# Altium PCB NeoLink Basic Main Board.PcbDoc (part 4 of 5)
Units mm, origin at the board's own origin, x right, y up, seen from the top; angles counter-clockwise.
Board outline 70 x 115 mm, 6 copper layers (Top Layer, Layer 2, Layer 3, Layer 4, Layer 5, Bottom Layer), stack 1.148 mm thick; 467 components, 265 nets, 1397 pads, 1169 vias.
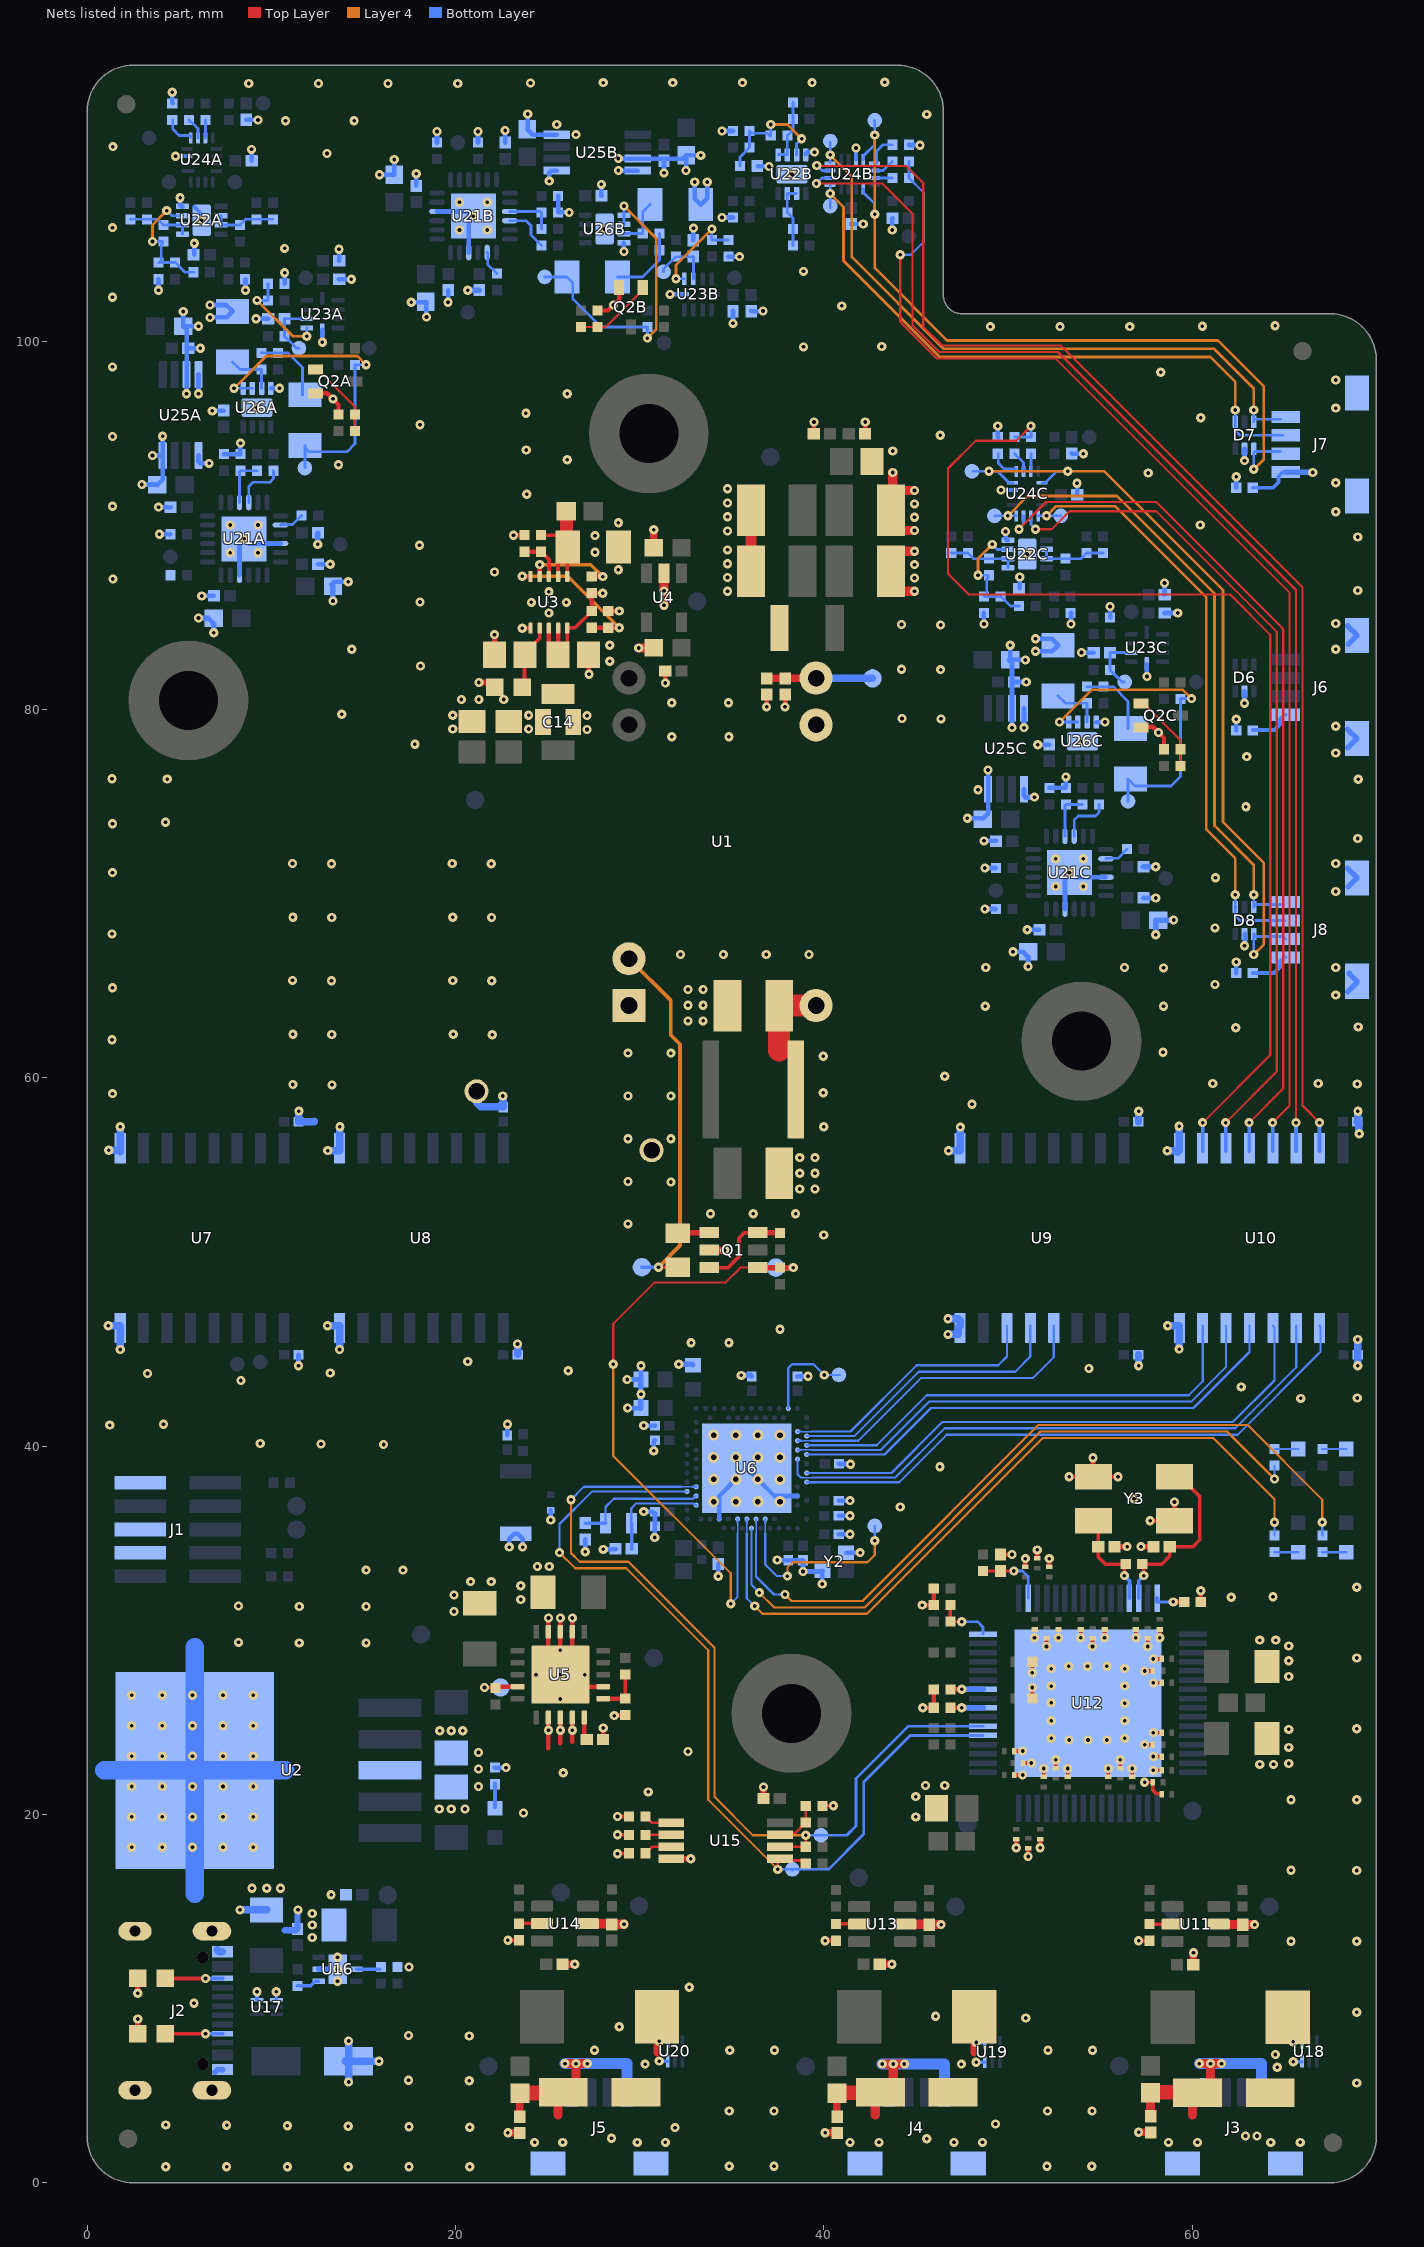
[diagram p7: the nets of this part, all layers, seen from the top]

## Via types
v1: diameter 0.5, hole 0.2, Top Layer to Bottom Layer, tented both sides, 1097 vias
v2: diameter 0.8, hole 0.4, Top Layer to Bottom Layer, tented both sides, 32 vias
v3: diameter 0.5, hole 0.2, Top Layer to Bottom Layer, 24 vias
v4: diameter 0.6, hole 0.3, Top Layer to Bottom Layer, 16 vias

## Nets (pads, with @x,y where several pads share a name; then routed paths per layer and width w, separated by ;. In a path a pad name is that pad's centre, name@x,y a point inside that pad or via, vN(x,y) a via of type N, cw(c..) or ccw(c..) an arc to the next point about the centre after c; other vN are vias at no path point) (continued)
ECG_CH1_LED_IND: R23.2 U6.B13 | length 40.6
  Layer 4 w0.12: v1(36.25,31.325) 36.675,30.9 42.35,30.9 51.9,40.45 61.15,40.45 64.475,37.125 v1(64.475,35.875)
  Bottom Layer w0.076: 35.825,35.25 35.825,35.85
  Bottom Layer w0.12: 35.825,35.25 35.825,31.75 v1(36.25,31.325) ; 35.825,35.85 U6.B13@35.825,36.05 ; R23.2@64.475,35.15 v1@64.475,35.825
ECG_CH1_NEGA: R81A.1 R82A.1 R85A.2 U22A.6 U22A.7 | length 3.4
  Bottom Layer w0.12: R81A.1@9.2,106.625 R82A.1@10.1,106.625
  Bottom Layer w0.15: U22A.6@7.275,106.825 U22A.7@7.275,106.325 R85A.2@8.3,106.325 8.6,106.625 R81A.1@9.2,106.625
ECG_CH1_NEGB: R81B.1 R82B.1 R85B.2 U22B.6 U22B.7 | length 3.4
  Bottom Layer w0.15: R82B.1@38.325,105.2 R81B.1@38.325,106.1 38.325,106.7 R85B.2@38.025,107 U22B.7@38.025,108.025 U22B.6@38.525,108.025
ECG_CH1_NEGC: R81C.1 R82C.1 R85C.2 U22C.6 U22C.7 | length 3.7
  Bottom Layer w0.15: U22C.6@52.1,88.7 U22C.7@52.1,88.2 53.975,88.2 R81C.1@54.275,88.5 R82C.1@55.175,88.5
ECG_CH1_POSA: R65A.2 R72A.1 R75A.1 U22A.1 U22A.2 | length 3.4
  Bottom Layer w0.15: R72A.1@2.35,106.625 R75A.1@3.25,106.625 3.85,106.625 R65A.2@4.15,106.325 U22A.2@5.175,106.325 U22A.1@5.175,105.825
ECG_CH1_POSB: R65B.2 R72B.1 R75B.1 U22B.1 U22B.2 | length 3.4
  Bottom Layer w0.15: U22B.1@37.525,110.15 38.025,110.15 R65B.2@38.025,111.175 38.325,111.475 R75B.1@38.325,112.075 R72B.1@38.325,112.975
ECG_CH1_POSC: R65C.2 R72C.1 R75C.1 U22C.1 U22C.2 | length 3.7
  Bottom Layer w0.15: R72C.1@46.925,88.5 R75C.1@47.825,88.5 48.125,88.2 U22C.2@50,88.2 U22C.1@50,87.7
ECG_CH1_SW_NEG: U6.W24 U9.5 | length 15.6
  Bottom Layer w0.12: U6.W24@39.075,40.55 41.664,40.55 45.164,44.05 50.4,44.05 51.22,44.87 U9.5@51.22,46.55
ECG_CH1_SW_POS: U6.V23 U9.4 | length 17.5
  Bottom Layer w0.076: 38.775,40.3 39.375,40.3
  Bottom Layer w0.12: U6.V23@38.575,40.3 38.775,40.3 ; 39.375,40.3 41.875,40.3 45.275,43.7 51.35,43.7 52.49,44.84 U9.4@52.49,46.55
ECG_CH1_SW_RLD: U6.Y23 U9.6 | length 14.7
  Bottom Layer w0.076: 38.775,40.8 39.375,40.8
  Bottom Layer w0.12: U6.Y23@38.575,40.8 38.775,40.8 ; 39.375,40.8 41.45,40.8 45.05,44.4 49.475,44.4 49.95,44.875 U9.6@49.95,46.55
ECG_CH2.SW_NEG_ISO: U10.14 U24B.14 | length 70.1
  Top Layer w0.12: v1(39.6,108.575) 43.175,108.575 44.825,106.925 44.825,100.875 46.275,99.425 52.725,99.425 65.65,86.5 v1(65.65,57.575)
  Bottom Layer w0.15: v1(39.6,108.575) 39.9,108.875 U24B.14@40.35,108.875
  Bottom Layer w0.2: U10.14@65.65,56.03 v1(65.65,57.575)
ECG_CH2.SW_POS_ISO: U10.15 U24B.15 | length 72.3
  Top Layer w0.12: v1(39.625,109.55) 39.65,109.525 44.475,109.525 45.4,108.6 45.4,100.8 46.425,99.775 52.875,99.775 66,86.65 66,58.5 v1(66.925,57.575)
  Bottom Layer w0.15: v1(39.625,109.55) 39.9,109.275 U24B.15@40.35,109.275
  Bottom Layer w0.2: U10.15@66.925,56.03 v1(66.925,57.575)
ECG_CH2.SW_RLD_ISO: R21B.2 R24B.2 U10.13 | length 67.8
  Top Layer w0.12: v1(44.15,104.7) 44.15,101.05 46.125,99.075 52.575,99.075 65.3,86.35 65.3,58.5 v1(64.375,57.575)
  Bottom Layer w0.12: v1(44.15,104.7) 44.725,104.7 45.4,105.375 45.4,108.1 R21B.2@44.625,108.875
  Bottom Layer w0.15: R21B.2@44.625,108.875 R24B.2@44.625,109.775
  Bottom Layer w0.2: U10.13@64.375,56.03 v1(64.375,57.575)
ECG_CH2_CON_NEG: D7.4 J7.2 TP34B.1 U24B.13 | length 34.5
  Layer 4 w0.15: v1(40.35,108.025) 41.075,107.3 41.075,104.375 46.3,99.15 61,99.15 62.35,97.8 v1(62.35,96.275)
  Bottom Layer w0.15: TP34B.1@40.35,107.275 v1(40.35,108.025) U24B.13@40.35,108.5 ; v1(62.35,96.275) D7.4@62.35,95.635 62.35,95.15 62.6,94.9 J7.2@64.926,94.9
ECG_CH2_CON_POS: D7.6 J7.1 TP31B.1 U24B.16 | length 35.2
  Layer 4 w0.15: v1(40.35,110.125) 41.525,108.95 41.525,104.575 46.5,99.6 61.2,99.6 63.35,97.45 v1(63.35,96.275)
  Bottom Layer w0.15: U24B.16@40.35,109.7 v1(40.35,110.125) TP31B.1@40.35,110.8 ; D7.6@63.35,95.635 v1(63.35,96.275) ; D7.6@63.355,95.775 J7.1@64.801,95.775
ECG_CH2_CON_RLD: D7.1 J7.3 TP37B.1 U24B.4 U24B.9 | length 42.1
  Layer 4 w0.15: v1(42.775,111.2) v1(42.775,106.9) 42.775,103.975 46.7,100.05 61.4,100.05 63.9,97.55 63.9,93.6 v1(63.35,93.05)
  Bottom Layer w0.15: U24B.9@42.15,108.275 42.175,108.25 42.175,108.05 42.775,107.45 v1(42.775,106.9) ; U24B.4@42.15,109.875 42.175,109.9 42.175,110.1 42.775,110.7 v1(42.775,111.2) 42.775,111.95 TP37B.1@42.737,111.987 ; v1(63.35,93.05) 63.35,93.945 63.43,94.025 J7.3@64.802,94.025
ECG_CH2_LED_IND: R16.2 U6.A14 | length 37.7
  Layer 4 w0.12: v1(36.506,32.053) 37.309,31.25 42.225,31.25 51.775,40.8 61.9,40.8 v1(64.475,38.225)
  Bottom Layer w0.12: U6.A14@36.075,35.55 36.075,32.484 v1(36.506,32.053) ; v1@64.475,38.275 R16.2@64.475,38.95
ECG_CH2_SW_NEG: U6.P23 U10.3 | length 32.7
  Bottom Layer w0.076: 38.875,38.3 39.375,38.3
  Bottom Layer w0.12: U6.P23@38.575,39.3 38.575,38.475 38.75,38.3 38.875,38.3 ; 39.375,38.3 43.889,38.3 46.564,40.975 62.35,40.975 65.66,44.285 U10.3@65.66,46.55
ECG_CH2_SW_POS: U6.J24 U10.2 | length 32.3
  Bottom Layer w0.12: U6.J24@39.075,38.05 44.1,38.05 46.675,40.625 62.475,40.625 66.975,45.125 66.975,46.505 U10.2@66.93,46.55
ECG_CH2_SW_RLD: U6.L24 U10.4 | length 30.5
  Bottom Layer w0.12: U6.L24@39.075,38.55 43.675,38.55 46.45,41.325 62.225,41.325 64.475,43.575 64.475,46.465 U10.4@64.39,46.55
ECG_CH3.SW_NEG_ISO: U10.11 U24C.14 | length 46.4
  Top Layer w0.12: v1(51.5,89.8) 52.375,89.8 53.35,90.775 58.05,90.775 64.6,84.225 64.6,60.35 v1(61.825,57.575)
  Bottom Layer w0.15: U24C.14@51.25,90.525 51.25,90.05 v1(51.5,89.8)
  Bottom Layer w0.2: U10.11@61.825,56.03 v1(61.825,57.575)
ECG_CH3.SW_POS_ISO: U10.12 U24C.15 | length 47.8
  Top Layer w0.12: v1(50.6,89.8) 52.075,91.275 58.05,91.275 64.95,84.375 64.95,59.425 v1(63.1,57.575)
  Bottom Layer w0.15: v1(50.6,89.8) 50.85,90.05 U24C.15@50.85,90.525
  Bottom Layer w0.2: U10.12@63.1,56.03 v1(63.1,57.575)
ECG_CH3.SW_RLD_ISO: R21C.2 R24C.2 U10.10 | length 61.1
  Top Layer w0.12: v1(51.25,95.4) 50.45,94.6 48.25,94.6 46.75,93.1 46.75,87.375 47.875,86.25 62.075,86.25 64.25,84.075 64.25,61.25 v1(60.575,57.575)
  Bottom Layer w0.15: R24C.2@50.375,94.8 51.275,94.8 51.25,94.825 v1(51.25,95.4)
  Bottom Layer w0.2: U10.10@60.575,56.03 v1(60.575,57.575)
ECG_CH3_CON_NEG: D8.4 J8.2 TP34C.1 U24C.13 | length 32.9
  Layer 4 w0.15: v1(52.1,90.525) 52.625,91.05 55.825,91.05 60.775,86.1 60.775,73.5 62.35,71.925 v1(62.35,69.95)
  Bottom Layer w0.15: U24C.13@51.65,90.525 v1(52.1,90.525) TP34C.1@52.875,90.525 ; v1(62.35,69.95) D8.4@62.35,69.285 62.35,68.8 62.6,68.55 J8.2@65.052,68.55
ECG_CH3_CON_POS: D8.6 J8.1 TP31C.1 U24C.16 | length 34.4
  Layer 4 w0.15: v1(50,90.525) 51.075,91.6 55.925,91.6 61.225,86.3 61.225,73.7 63.35,71.575 v1(63.35,69.95)
  Bottom Layer w0.15: TP31C.1@49.3,90.525 v1(50,90.525) U24C.16@50.45,90.525 ; D8.6@63.35,69.285 v1(63.35,69.95) ; D8.6@63.355,69.425 J8.1@64.801,69.425
ECG_CH3_CON_RLD: D8.1 J8.3 TP37C.1 U24C.4 U24C.9 | length 43.4
  Layer 4 w0.15: v1(48.975,92.95) v1(53.25,92.95) 55.225,92.95 61.675,86.5 61.675,73.9 63.9,71.675 63.9,67.25 v1(63.35,66.7)
  Bottom Layer w0.15: TP37C.1@48.1,92.95 v1(48.975,92.95) 49.425,92.95 50.05,92.325 U24C.4@50.275,92.325 ; U24C.9@51.875,92.325 52.05,92.325 52.675,92.95 v1(53.25,92.95) ; v1(63.35,66.7) D8.1@63.35,67.815 ; D8.1@63.375,67.815 63.375,67.755 D8.1@63.455,67.675 ; D8.1@63.43,67.675 J8.3@64.927,67.675 ; J8.3@64.952,67.675 J8.3@65.077,67.55
ECG_CH3_LED_IND: R22.2 U6.B15 | length 42
  Layer 4 w0.12: v1(37.9,31.95) 38.25,31.6 42.1,31.6 51.65,41.15 63.025,41.15 67.075,37.1 v1(67.075,35.875)
  Bottom Layer w0.076: 36.325,35.25 36.325,35.85
  Bottom Layer w0.12: 36.325,35.25 36.325,32.925 37.3,31.95 v1(37.9,31.95) ; 36.325,35.85 U6.B15@36.325,36.05 ; R22.2@67.075,35.15 v1@67.075,35.85
ECG_CH3_SW_NEG: U6.T23 U10.6 | length 27.4
  Bottom Layer w0.076: 38.775,39.8 39.375,39.8
  Bottom Layer w0.12: U6.T23@38.575,39.8 38.775,39.8 ; 39.375,39.8 43.089,39.8 45.714,42.425 59.95,42.425 61.85,44.325 61.85,45.092 U10.6@61.85,46.55
ECG_CH3_SW_POS: U6.R24 U10.5 | length 27.8
  Bottom Layer w0.12: U6.R24@39.075,39.55 43.3,39.55 45.825,42.075 60.075,42.075 63.12,45.12 U10.5@63.12,46.55
ECG_CH3_SW_RLD: U6.U24 U10.7 | length 26
  Bottom Layer w0.12: U6.U24@39.075,40.05 42.875,40.05 45.6,42.775 59.825,42.775 60.58,43.53 U10.7@60.58,46.55
ENABLE_5V_ISO: Q1.1 R8.2 TP6.1 U6.B11 | length 34.4
  Top Layer w0.12: v1(28.575,44.45) 28.575,46.65 30.825,48.9 34.675,48.9 35.475,49.7 Q1.1@36.425,49.7
  Top Layer w0.3: Q1.1@36.425,49.7 R8.2@37.625,49.7 v1(38.35,49.7)
  Layer 4 w0.12: v1(28.575,44.45) 28.575,39.475 34.95,33.1 v1(34.95,31.45)
  Bottom Layer w0.076: 35.325,35.25 35.325,35.85
  Bottom Layer w0.12: v1(34.95,31.45) 35.325,31.825 35.325,35.25 ; 35.325,35.85 U6.B11@35.325,36.05
  Bottom Layer w0.3: TP6.1@37.55,49.7 v1(38.35,49.7)
FDA1_1V25_REFA: C122A.1 R86A.2 TP36A.1 U23A.7 | length 3.2
  Bottom Layer w0.15: TP36A.1@11.5,99.625 11.375,99.625 10.925,100.075 R86A.2@10.725,100.275 10.725,101.215 C122A.1@10.715,101.225 U23A.7@11.925,101.225
FDA1_1V25_REFB: C122B.1 R86B.2 TP36B.1 U23B.7 | length 3.3
  Bottom Layer w0.15: TP36B.1@31.3,103.775 31.3,103.925 R86B.2@31.975,104.6 32.915,104.6 C122B.1@32.925,104.61 U23B.7@32.925,103.4
FDA1_1V25_REFC: C122C.1 R86C.2 TP36C.1 U23C.7 | length 3.2
  Bottom Layer w0.15: TP36C.1@56.325,81.5 56.2,81.5 55.75,81.95 R86C.2@55.55,82.15 55.55,83.09 C122C.1@55.54,83.1 U23C.7@56.75,83.1
FULLPWRMG: R48.1 U12.8 | length 1.8
  Top Layer w0.25: R48.1@46.875,25.8 v1(47.5,25.8)
  Bottom Layer w0.3: v1(47.5,25.8) U12.8@48.65,25.8
GANGED: R47.1 U12.10 | length 1.8
  Top Layer w0.25: R47.1@46.875,26.8 v1(47.5,26.8)
  Bottom Layer w0.3: v1(47.5,26.8) U12.10@48.65,26.8
GND: C1.2 C2.2 C12.2 C13.2 C23.2 C24.2 C25.2 C27.1 C28.2 C29.2 C30.2 C31.1 C33.1 C35.1 C37.2 C38.2 C39.2 C40.2 C41.2 C42.2 C43.2 C44.2 C45.2 C46.2 C47.2 C48.2 C49.2 C50.2 C51.2 C52.2 C53.2 C54.2 C55.2 C56.2 C57.2 C58.2 C59.2 C60.2 C61.2 C62.2 C63.2 C64.2 C65.2 C66.2 C67.2 C68.2 C69.2 C70.2 C71.2 C72.2 C73.2 C74.2 C75.2 C76.2 C77.2 C78.2 C79.2 C80.2 C81.2 C82.2 C83.2 C84.2 C85.2 C86.2 C87.2 C88.2 C89.2 C90.2 C91.2 C92.2 C93.2 C94.2 C95.2 C96.2 C97.2 C98.2 C99.2 C100.2 C101.2 C102.2 C103.2 C104.2 C105.2 C106.2 C107.2 C108.2 C126.1 D1.A D2.A D3.A D4.A D5.A J1.3 J1.5 J1.9 J2.A1_B12 J2.B1_A12 J2.SH1 J2.SH2 J2.SH3 J2.SH4 J3.4 J3.5 J3.6 J4.4 J4.5 J4.6 J5.4 J5.5 J5.6 Q1.5 R3.2 R13.2 R35.2 R36.1 R38.2 R41.2 R43.2 R45.2 R46.2 R47.2 R48.2 R52.2 R53.2 R54.2 R55.2 R57.2 R58.2 R59.2 R98.2 SW1.2 U1.1 U2.3 U2.6 U5.2 U5.3 U5.4 U5.12 U5.13 U5.14 U5.17 U5.21 U6.B7 U6.EP U6.F23 U7.8 U8.8 U9.8 U10.8 U11.2 U12.65 U13.2 U14.2 U15.4 U16.5 U16.7 U17.3 U17.4 U18.3 U18.4 U19.3 U19.4 U20.3 U20.4 Y2.2 Y2.4 Y3.2 Y3.4 | length 145.5
  Top Layer w0.2: v1(28.8,17.875) 28.813,17.888 29.412,17.888 R52.2@29.425,17.9 ; v1(28.8,18.9) R53.2@29.425,18.9 ; v1(28.8,19.9) R54.2@29.425,19.9 ; R55.2@39.925,20.475 v1(40.525,20.475) ; C71.2@50.35,22.15 v1(50.8,22.15) ; C70.2@50.35,23.45 v1(50.8,23.45) ; C72.2@50.825,22.8 v1(51.275,22.8) ; R98.2@51.325,26.3 v1(51.325,26.9) ; v1(51.325,27.7) R45.2@51.325,28.3 ; C82.2@51.95,22.05 v1(51.95,22.5) ; v1(52.1,29.125) C75.2@52.1,29.575 ; C84.2@52.6,22.525 v1(52.6,22.975) ; C83.2@53.25,22.05 v1(53.25,22.5) ; v1(53.95,29.6) C101.2@53.95,30.05 ; v1(54.6,29.125) C99.2@54.6,29.575 ; v1(55.25,29.6) C100.2@55.25,30.05 ; C86.2@55.45,22.05 v1(55.45,22.5) ; C85.2@56.1,22.525 v1(56.1,22.975) ; C87.2@56.75,22.05 v1(56.75,22.5) ; v1(56.95,29.6) C78.2@56.95,30.05 ; v1(57.425,21.75) C69.2@57.875,21.75 57.875,21.325 58.063,21.137 58.325,21.137 58.35,21.112 C68.2@58.35,21.1 ; v1(57.425,23.8) C93.2@57.875,23.8 ; v1(57.425,27.8) C88.2@57.875,27.8 ; v1(57.6,29.125) C77.2@57.6,29.575 ; v1(57.9,22.4) C67.2@58.35,22.4 ; v1(57.9,23.15) C91.2@58.35,23.15 ; v1(57.9,24.45) C94.2@58.35,24.45 ; v1(57.9,27.15) C90.2@58.35,27.15 ; v1(57.9,28.45) C89.2@58.35,28.45 ; v1(58.25,29.6) C76.2@58.25,30.05
  Top Layer w0.25: v1(22.85,13.175) R43.2@23.45,13.175 ; 25.05,23.6 v1(25.05,24.575) U5.12@25.05,25.275 ; v1(25.05,30.675) U5.4@25.05,29.925 25.05,28.25 v3(25.7,27.6) ; 25.7,23.875 v1(25.7,24.575) U5.13@25.7,25.275 ; v3(25.7,28.925) v1(25.7,30.675) ; 26.35,23.95 v1(26.35,24.575) U5.14@26.35,25.275 ; v1(26.35,30.675) U5.2@26.35,29.925 26.35,28.25 v3(25.7,27.6) ; C25.2@28.015,24.075 28.02,24.08 28.02,24.695 v1(28.025,24.7) ; U5.17@28.025,26.95 26.35,26.95 v3(25.7,27.6) ; v1(28.625,25.375) 28.637,25.387 29.212,25.387 R13.2@29.225,25.4 ; Q1.5@33.775,50.65 Q1.5@33.787,50.637 ; v1(40.075,13.15) R41.2@40.675,13.15 ; v1(45.35,31.375) R38.2@45.975,31.375 R46.2@45.975,32.275 ; v1(45.378,25.8) R48.2@45.975,25.8 R47.2@45.975,26.8 ; C58.2@49.6,34.115 49.605,34.12 50.22,34.12 v1(50.225,34.125) ; v1(50.45,18.2) C95.2@50.45,18.65 ; C97.2@50.95,33.45 v1(50.95,33.9) ; v1(51.1,17.725) C80.2@51.1,18.175 ; C96.2@51.6,33.925 v1(51.6,34.375) ; v1(51.75,18.2) C81.2@51.75,18.65 ; C98.2@52.25,33.45 v1(52.25,33.9) ; v1(53.325,38.35) Y3.4@54.65,38.35 ; v1(54.625,39.375) 54.625,38.375 Y3.4@54.65,38.35 ; v1(55.975,38.35) Y3.4@54.65,38.35 ; v1(57.1,13.15) R35.2@57.7,13.15 ; v1(57.725,35.95) Y3.2@59.05,35.95 v1(59.05,36.975) ; C57.2@60.065,11.85 C57.2@60.07,11.855 ; v1@60.07,12.495 v1(60.075,12.5) ; R36.1@60.475,31.55 v1(60.475,32.15)
  Top Layer w0.3: R59.2@2.75,8.1 v1(2.75,8.9) ; v1(2.75,10.3) R58.2@2.75,11.1 ; C24.2@24.3,32.425 C24.2@24.45,32.575 ; C24.2@24.35,31.675 C24.2@25.1,32.425 ; U15.4@31.725,17.6 v1(32.775,17.6) ; Q1.5@33.787,50.637 Q1.5@33.8,50.65 ; v1(36.725,21.5) 36.73,21.495 36.73,20.88 C65.2@36.735,20.875 ; C54.2@55.79,34.55 v1(56.475,34.55) ; v1(57.225,34.55) C55.2@57.91,34.55
  Top Layer w0.4: v1(22.85,2.725) C108.2@23.485,2.725 ; C64.2@25.815,11.875 v1(26.475,11.875) ; C62.2@30.125,8.2 C62.2@30.95,9.025 30.95,7.075 ; C62.2@31.9,8.075 31.9,8.525 C62.2@31.95,8.575 ; Q1.5@33.8,50.65 v1(34.625,50.65) ; v1(40.075,2.725) C107.2@40.71,2.725 ; C61.2@43.04,11.875 v1(43.7,11.875) ; C59.2@47.35,8.2 C59.2@48.175,9.025 48.175,7.05 ; C59.2@49.125,8.075 49.125,8.5 C59.2@49.175,8.55 ; v1(57.1,2.75) 57.108,2.742 57.743,2.742 C106.2@57.75,2.735 ; C57.2@60.07,11.855 v1@60.07,12.495 ; C79.2@64.075,28.1 C79.2@64.125,28.05
  Top Layer w0.5: U14.2@27.235,14.075 C63.2@28.5,14.075 ; C63.2@28.5,14.04 28.51,14.05 v1(29.15,14.05) ; U13.2@44.46,14.05 C60.2@45.725,14.05 ; C60.2@45.725,14.015 45.735,14.025 v1(46.375,14.025) ; U11.2@61.45,14.05 61.468,14.032 62.732,14.032 62.74,14.025 v1(63.4,14.025)
  Bottom Layer w0.2: U17.3@9.225,9.975 v1(9.225,10.375) ; U17.4@10.275,9.95 v1(10.275,10.375) ; v1(31.072,6.612) U20.3@31.522,6.612 ; v1(31.072,7.687) 31.522,7.687 U20.4@31.522,7.662 ; v1(48.275,6.55) U19.3@48.725,6.55 ; v1(48.275,7.625) U19.4@48.725,7.625 ; v1(65.497,6.582) U18.3@65.947,6.582 ; v1(65.497,7.657) U18.4@65.947,7.657
  Bottom Layer w0.25: v1(11.475,44.375) 11.478,44.377 11.478,44.973 C27.1@11.48,44.975 ; R3.2@22.15,22.55 22.3,22.55 v1(22.75,22.55) ; C30.2@22.825,40.59 v1(22.825,41.2) ; v1(22.925,34.525) 22.925,34.975 23.2,35.25 SW1.2@23.275,35.25 23.375,35.25 23.65,34.975 v1(23.65,34.525) ; C31.1@23.374,44.969 C31.1@23.38,44.975 ; v1(25.175,36) D1.A@25.175,36.53 ; v1(27.05,34.275) C29.2@27.05,34.945 ; v1(28.025,34.4) 28.038,34.413 28.683,34.412 C28.2@28.695,34.425 ; v1(29.325,43.625) C51.2@30.075,43.625 v1(30.075,44.375) ; v1(29.35,42.075) C38.2@30.075,42.075 ; v1(30.225,36.45) 30.68,36.45 C48.2@30.755,36.375 ; v1(30.225,41.125) C42.2@30.835,41.125 ; C41.2@30.775,40.265 v1(30.775,39.75) v1@30.805,39.78 ; C41.2@30.805,40.295 C41.2@30.835,40.325 ; v1@30.825,35.175 v1@30.83,35.18 ; v1@30.83,35.055 v1@30.83,35.18 ; C39.2@30.83,35.65 v1@30.83,35.18 ; C39.2@30.83,35.75 30.835,35.755 C48.2@30.835,36.35 ; C52.2@32.85,44.45 C52.2@32.9,44.4 ; v1(34.275,32.94) C46.2@34.275,33.61 ; U6.B7@34.325,36.05 34.325,37.3 v4(35.225,38.2) ; v1(35.524,43.85) v1@35.554,43.82 ; U6.EP@35.825,38.8 v4(36.425,38.2) 37.325,37.3 U6.F23@38.575,37.3 ; C43.2@36.07,43.82 C43.2@36.1,43.79 ; v1(37.475,33.825) 37.482,33.818 38.868,33.818 C45.2@38.875,33.81 v1(38.875,33.2) 39.9,33.2 Y2.4@39.925,33.225 ; C44.2@38.575,43.79 38.58,43.795 39.145,43.795 v1(39.15,43.8) ; v1(39.925,32.525) Y2.4@39.925,33.225 ; Y2.4@39.938,33.238 Y2.4@39.925,33.225 ; C49.2@40.815,36.225 v1(41.425,36.225) ; C47.2@40.815,37.05 v1(41.425,37.05) ; C37.2@40.82,35.23 C37.2@40.815,35.225 v1(41.425,35.225) ; C50.2@40.828,39.052 C50.2@40.83,39.05 40.843,39.037 41.438,39.037 v1(41.45,39.025) ; Y2.2@41.213,34.213 41.225,34.225 v1(41.975,34.225) ; C33.1@57.08,44.975 C33.1@57.09,44.965 ; v1@57.09,44.385 v1(57.1,44.375)
  Bottom Layer w0.3: J2.SH1@6.78,5.03 J2.SH1@6.93,5.18 ; J2.A1_B12@6.93,6 7.08,6.15 J2.A1_B12@7.355,6.15 ; v1@11.425,14.8 v1(11.45,14.825) ; U16.5@12.58,11.6 v1(13.6,11.6) ; C38.2@30.075,42.075 v1(30.075,42.825) C51.2@30.075,43.625 ; v1(32.125,44.45) C52.2@32.85,44.45 ; v1(35.524,43.85) C43.2@36.04,43.85
  Bottom Layer w0.35: 10.725,13.725 11.36,13.725 C102.2@11.425,13.79 v1@11.425,14.8
  Bottom Layer w0.4: v1(1.145,46.55) U7.8@1.805,46.55 ; v1@1.8,45.255 U7.8@1.8,46.545 ; J2.SH2@6.78,13.67 6.79,13.67 J2.SH2@7.067,13.393 ; J2.B1_A12@7.067,12.65 7.167,12.55 J2.B1_A12@7.355,12.55 ; v1(8.3,14.825) C103.2@9.75,14.825 ; v1(13.055,46.55) U8.8@13.715,46.55 ; v1@13.71,45.255 U8.8@13.71,46.545 ; D2.A@14.025,6.6 14.2,6.775 v1(14.2,7.7) ; v1(14.2,5.475) D2.A@14.2,6.6 v1@15.675,6.6 ; C31.1@23.375,44.98 v1(23.375,45.55) ; v1(46.75,46.075) 47.31,46.075 47.31,46.45 47.41,46.55 47.41,46.825 47.31,46.925 v1(46.75,46.925) ; v1@57.09,44.385 C33.1@57.09,44.965 ; v1(58.675,46.55) 59.31,46.55 59.305,46.545 59.305,45.28 v1(59.3,45.275) ; v1(69,44.375) v1(69,45.8)
  Bottom Layer w1: 0.925,22.4 U2.6@5.85,22.4 ; U2.6@5.825,22.4 10.75,22.4 ; 5.85,15.7 U2.6@5.85,22.4 ; 5.85,29.1 U2.6@5.85,22.4
  other v1: 4.275,0.875 7.575,0.875 10.875,0.875 14.175,0.875 17.475,0.875 20.775,0.875 34.875,0.9 37.3,0.9 52.125,0.9 54.55,0.9 24.3,2.2 25.825,2.2 29.875,2.2 31.4,2.2 41.425,2.2 43,2.2 47.075,2.2 48.625,2.2 58.725,2.2 60.3,2.2 64.275,2.2 65.875,2.2 45.6,2.4 28.475,2.425 62.9,2.55 63.525,2.55 31.925,3 20.775,3.025 17.475,3.05 14.175,3.075 10.875,3.1 7.575,3.125 4.275,3.15 49.325,3.2 34.875,3.9 37.3,3.9 52.15,3.9 54.575,3.9 68.95,5.425 20.75,5.55 17.45,5.575 64.625,6.275 30.3,6.45 47.475,6.45 15.85,6.6 64.525,6.975 27.55,7.2 34.9,7.2 37.325,7.2 52.175,7.2 54.6,7.2 20.75,7.975 17.45,8 28.9,8.475 50.975,8.95 46.075,9.05 68.95,9.271 5.8,9.75 32.7,10.625 13.6,10.95 17.475,11.725 13.6,12.25 65.375,13.125 68.95,13.118 12.225,13.325 12.225,14 12.225,14.625 13.25,15.65 8.95,16 9.75,16 10.5,16 68.95,16.964 65.375,16.975 2.425,18.225 4.075,18.225 5.725,18.225 7.375,18.225 9.025,18.225 2.425,19.875 4.075,19.875 5.725,19.875 7.375,19.875 9.025,19.875 45,19.875 23.693,20.083 19.125,20.3 19.775,20.3 20.525,20.3 65.375,20.8 68.95,20.811 45,20.975 30.468,21.233 2.425,21.525 4.075,21.525 5.725,21.525 7.375,21.525 9.025,21.525 21.25,21.525 45.525,21.575 46.575,21.575 25.85,22.275 21.25,22.475 63.675,22.725 64.425,22.725 65.25,22.775 2.425,23.175 4.075,23.175 5.725,23.175 7.375,23.175 9.025,23.175 21.25,23.375 32.625,23.425 65.25,23.65 53.325,24.05 54.35,24.05 55.375,24.05 52.35,24.15 56.35,24.15 19.15,24.55 19.775,24.55 20.4,24.55 65.25,24.625 68.95,24.657 2.425,24.825 4.075,24.825 5.725,24.825 7.375,24.825 9.025,24.825 52.35,25.1 56.35,25.1 56.35,26.05 52.35,26.075 2.425,26.475 4.075,26.475 5.725,26.475 7.375,26.475 9.025,26.475 52.35,26.975 56.35,26.975 65.25,27.5 52.35,27.925 56.35,27.925 53.3,28.05 54.325,28.05 55.375,28.05 65.25,28.35 68.95,28.504 65.25,29.15 11.525,29.325 15.15,29.325 8.225,29.35 63.675,29.475 64.55,29.475 51.45,29.6 52.75,29.6 19.925,31.025 11.525,31.3 15.15,31.3 8.225,31.325 23.55,31.675 62.125,31.8 64.4,31.825 19.925,31.925 68.95,32.35 23.55,32.425 20.825,32.65 21.95,32.65 15.15,33.275 17.15,33.275 24.45,33.475 25.1,33.475 30.825,35.05 44.15,36.7 56.85,37.15 46.307,38.892 16.1,40.1 12.7,40.125 9.4,40.15 1.225,41.15 4.15,41.2 65.9,42.6 68.975,42.625 62.675,43.225 8.35,43.575 3.275,43.95 13.2,43.975 26.125,44.1 54.4,44.225 20.675,44.6 1.795,45.25 13.705,45.25 32.8,45.625 34.85,45.625 37.625,46.35 40,51.475 29.375,52.075 33.85,52.625 36.175,52.625 38.475,52.625 38.7,53.975 39.525,53.975 31.7,54.35 29.375,54.375 38.7,54.825 39.525,54.825 38.7,55.675 39.525,55.675 29.375,56.7 31.7,56.7 40,57.35 29.375,59.025 31.7,59.025 39.975,59.2 39.975,61.175 29.375,61.35 31.7,61.35 32.625,63.1 33.45,63.1 32.625,63.95 33.45,63.95 32.625,64.8 33.45,64.8 32.225,66.7 34.55,66.7 36.875,66.7 39.2,66.7
  other v3: 25.7,26.275 24.375,27.6 27.025,27.6
  other v4: 34.025,37 35.225,37 36.425,37 37.625,37 34.025,38.2 37.625,38.2 34.025,39.4 35.225,39.4 36.425,39.4 37.625,39.4 34.025,40.6 35.225,40.6 36.425,40.6 37.625,40.6
GND_ISO: C3.2 C4.2 C5.2 C6.2 C7.2 C8.2 C9.2 C10.2 C11.2 C14.2 C14.4 C15.2 C16.2 C17.2 C18.2 C19.2 C20.2 C21.2 C22.2 C26.2 C32.2 C34.2 C36.2 C109A.2 C109B.2 C109C.2 C110A.2 C110B.2 C110C.2 C111A.2 C111B.2 C111C.2 C112A.2 C112B.2 C112C.2 C113A.2 C113B.2 C113C.2 C115A.2 C115B.2 C115C.2 C116A.2 C116B.2 C116C.2 C117A.2 C117B.2 C117C.2 C118A.2 C118B.2 C118C.2 C119A.2 C119B.2 C119C.2 C120A.2 C120B.2 C120C.2 C121A.2 C121B.2 C121C.2 C122A.2 C122B.2 C122C.2 C123A.2 C123B.2 C123C.2 C124A.2 C124B.2 C124C.2 C125A.2 C125B.2 C125C.2 C126.2 C127A.2 C127B.2 C127C.2 D6.2 D7.2 D8.2 J6.5 J6.6 J7.5 J7.6 J8.5 J8.6 Q2A.2 Q2B.2 Q2C.2 R9.2 R10.2 R11.2 R19A.2 R19B.2 R19C.2 R20A.2 R20B.2 R20C.2 R66A.1 R66B.1 R66C.1 R68A.2 R68B.2 R68C.2 R69A.2 R69B.2 R69C.2 R70A.2 R70B.2 R70C.2 R71A.1 R71B.1 R71C.1 R73A.2 R73B.2 R73C.2 R83A.2 R83B.2 R83C.2 R99.2 R100.2 R101.2 U1.10 U3.6 U3.11 U4.2 U7.9 U8.9 U9.9 U10.9 U21A.4 U21A.22 U21A.25 U21B.4 U21B.22 U21B.25 U21C.4 U21C.22 U21C.25 U22A.4 U22A.9 U22B.4 U22B.9 U22C.4 U22C.9 U23A.5 U23B.5 U23C.5 U24A.3 U24B.3 U24C.3 U25A.3 U25A.4 U25A.5 U25A.8 U25B.3 U25B.4 U25B.5 U25B.8 U25C.3 U25C.4 U25C.5 U25C.8 U26A.4 U26A.9 U26B.4 U26B.9 U26C.4 U26C.9 | length 165.6
  Top Layer w0.23: v1(13.35,96.875) 13.65,96.575 R19A.2@13.65,96.025 ; R19B.2@27.738,101.675 28.288,101.675 v1(28.588,101.975) ; v1(58.175,78.763) 58.475,78.463 R19C.2@58.475,77.913
  Top Layer w0.25: Q2A.2@12.4,97.175 13.05,97.175 v1(13.35,96.875) ; v1(23.15,89.475) R9.2@23.75,89.475 ; v1(23.625,84.425) U3.6@24,84.425 ; v1(27.25,81.925) C16.2@27.25,82.95 ; C16.2@27.6,82.6 C16.2@27.25,82.95 ; C16.2@27.6,83.35 C16.2@27.225,82.975 C16.2@27.25,82.95 ; R10.2@28.3,85.35 v1(28.9,85.35) ; v1(28.588,101.975) 28.888,102.275 Q2B.2@28.888,102.925 ; v1@31.398,81.452 C22.2@31.398,82.098 ; v1(36.9,80.15) C4.2@36.9,80.82 ; v1(37.9,80.15) C3.2@37.9,80.82 ; C11.2@39.46,94.975 39.468,94.982 39.468,95.617 v1(39.475,95.625) ; C10.2@42.24,94.975 42.245,94.98 42.245,95.62 v1(42.25,95.625) ; Q2C.2@57.225,79.063 57.875,79.063 v1(58.175,78.763)
  Top Layer w0.3: v1(21.275,81.475) 22,81.475 R11.2@22.25,81.225 ; C19.2@22.125,83.075 v1(22.125,84.075)
  Top Layer w0.4: C20.2@30.775,88.8 v1(30.775,89.775)
  Top Layer w0.5: C18.2@20.55,79.729 20.85,79.429 21,79.429 C18.2@21.3,79.729 ; C17.2@22.55,79.729 22.85,79.429 23.075,79.429 C17.2@23.375,79.729 ; v1(29.95,83.35) C21.2@30.775,83.35 ; v1(31.325,85.675) U4.2@31.325,87.35 ; C5.2@43.65,90.825 43.65,90.225 44.15,89.725 v1(44.925,89.725) ; C5.2@43.65,91.4 44.15,91.9 v1(44.925,91.9) ; C5.2@43.75,91.4 v1(43.75,92.875) ; v1(44.925,86.425) 44.15,86.425 43.65,86.925 C6.2@43.65,87.525 43.65,88.1 44.15,88.6 v1(44.925,88.6)
  Top Layer w0.6: C7.2@36.05,87.525 C8.2@36.05,90.825
  Bottom Layer w0.2: v1(4.8,110.05) U24A.3@5.425,110.05 U24A.3@5.45,110.05 ; U22A.4@5.175,107.325 U22A.4@5.2,107.3 ; U22A.9@5.827,107.3 6.225,106.902 v1(6.225,106.575) ; C118B.2@41.475,106.37 C118B.2@41.48,106.375 ; C118B.2@41.505,106.375 v1(42.15,106.375) ; U24B.3@41.75,109.875 v1(41.75,110.5) ; v1(49.625,91.925) U24C.3@50.275,91.925
  Bottom Layer w0.25: v1(2.975,92.225) 3.775,92.225 C119A.2@3.8,92.2 4.1,92.5 U25A.8@4.1,93.8 ; v1(3.55,93.8) U25A.8@4.1,93.8 v1(4.1,94.85) ; v1(3.875,91) C120A.2@4.535,91 ; v1(3.875,102.775) R71A.1@3.875,103.375 ; v1(3.925,89.525) R73A.2@4.525,89.525 ; v1(4.625,113.525) 4.625,112.95 R20A.2@4.65,112.925 ; U22A.4@5.05,107.398 v1(5.05,107.8) v1@5.098,107.752 ; U22A.4@5.098,107.35 5.123,107.325 U22A.4@5.175,107.325 ; v1(5.225,101.625) C115A.2@5.225,100.825 ; v1(5.4,97.15) 5.4,100.65 C115A.2@5.225,100.825 ; C116A.2@5.505,99.625 v1(6.15,99.625) ; C121A.2@5.825,104.715 5.818,104.722 5.818,105.318 v1(5.825,105.325) ; U25A.5@6.05,93.8 6.05,93.475 6.15,93.375 v1(6.625,93.375) ; v1(6.05,97.15) U25A.4@6.05,98.2 ; v1(6.05,100.825) C115A.2@5.225,100.825 ; v1(6.225,86.175) C113A.2@6.885,86.175 ; C112A.2@6.575,84.975 C112A.2@6.875,84.675 ; v1(6.675,101.3) 7.575,101.3 C117A.2@7.9,101.625 7.55,101.975 v1(6.675,101.975) ; v1(6.8,96.225) 6.803,96.227 7.423,96.227 C125A.2@7.425,96.23 ; R68A.2@7.425,93.875 R69A.2@8.325,93.875 v1(8.325,94.475) ; U21A.4@8.275,87.3 8.275,89.025 v3(8.525,89.275) 8.775,89.025 U21A.22@10.5,89.025 ; v1(8.6,102.775) R83A.2@8.6,103.375 ; C127A.2@8.65,112.035 8.655,112.03 9.27,112.03 v1(9.275,112.025) ; v1(8.925,110.425) 8.933,110.418 8.933,109.807 C118A.2@8.94,109.8 ; U26A.9@9.065,96.24 v1(9.225,96.4) ; v1(9.175,101.225) C122A.2@9.835,101.225 ; U26A.4@9.975,97.45 v1(10.45,97.45) ; R66A.1@10.725,103.125 v1(10.725,103.725) ; v1@11.49,58.19 v1(11.5,58.2) ; C111A.2@12.54,87.9 v1(13.2,87.9) ; v1(12.775,99.95) U23A.5@12.775,100.625 ; C110A.2@13.35,86.7 13.263,86.787 13.425,86.95 v1(14.175,86.95) ; v1@13.65,105 v1@13.658,104.993 ; C123A.2@13.658,104.383 C123A.2@13.665,104.375 ; C123A.2@13.683,104.383 v1@13.683,104.993 ; C124A.2@13.69,103.375 v1(14.35,103.375) ; v1@13.718,57.343 v1(13.725,57.35) ; v1(15.875,109.05) C112B.2@16.675,109.05 v1(16.675,109.875) ; v1(17.6,102.125) 18.375,102.125 C110B.2@18.4,102.15 18.425,102.125 v1(18.425,101.325) ; C113B.2@17.875,108.44 v1(17.875,109.1) ; U21B.4@19,107.05 20.725,107.05 v3(20.975,106.8) 20.725,106.55 U21B.22@20.725,104.825 ; R70B.2@19,110.8 v1(19,111.4) ; v1(19.6,102.125) C111B.2@19.6,102.785 ; R73B.2@21.225,110.8 v1(21.225,111.4) ; C120B.2@22.7,110.79 v1(22.7,111.45) ; v1(23.925,112.35) 23.925,111.55 C119B.2@23.9,111.525 24.2,111.225 U25B.8@25.5,111.225 ; v1(25.1,108.7) 25.1,109.175 25.2,109.275 U25B.5@25.5,109.275 ; R68B.2@25.575,107.9 R69B.2@25.575,107 v1(26.175,107) ; v1(27.925,108.525) 27.927,108.523 27.927,107.902 C125B.2@27.93,107.9 ; v1(28.85,109.275) U25B.4@29.9,109.275 ; v1(28.85,109.925) U25B.3@29.9,109.925 32.35,109.925 C115B.2@32.525,110.1 ; v1(29.15,104.875) U26B.4@29.15,105.35 ; v1(31.325,109.15) C116B.2@31.325,109.81 ; v1(31.65,102.55) U23B.5@32.325,102.55 ; v1(32.525,109.275) C115B.2@32.525,110.1 ; C122B.2@32.925,105.49 v1(32.925,106.15) ; v1(33,108.65) 33,107.75 C117B.2@33.325,107.425 33.675,107.775 v1(33.675,108.65) ; v1(33.325,110.1) C115B.2@32.525,110.1 ; v1(34.475,106.725) R83B.2@35.075,106.725 ; v1(34.475,111.425) R71B.1@35.075,111.425 ; R66B.1@34.825,104.6 v1(35.425,104.6) ; v1(35.075,100.975) C124B.2@35.075,101.635 ; C123B.2@36.075,101.66 C123B.2@36.082,101.667 ; C123B.2@36.082,101.642 v1@36.692,101.642 ; C121B.2@36.415,109.5 36.422,109.507 37.017,109.507 v1(37.025,109.5) ; v1@36.692,101.667 v1@36.7,101.675 ; U22B.4@39.025,110.15 39.025,110.202 U22B.4@39.05,110.227 ; U22B.4@39.098,110.275 v1(39.5,110.275) v1@39.452,110.227 ; v1(43.725,106.05) 43.73,106.055 43.73,106.67 C127B.2@43.735,106.675 ; R20B.2@44.625,110.675 44.638,110.662 45.212,110.662 v1(45.225,110.65) ; v1(47.8,74.1) 48.6,74.1 48.625,74.075 48.925,74.375 U25C.8@48.925,75.675 v1(48.925,76.725) ; v1(48.7,72.875) C120C.2@49.36,72.875 ; v1(48.7,84.65) R71C.1@48.7,85.25 ; v1(48.75,69.175) R70C.2@49.35,69.175 ; v1(48.75,71.4) R73C.2@49.35,71.4 ; v1(49.45,95.4) 49.45,94.825 R20C.2@49.475,94.8 ; U22C.4@49.875,89.273 v1(49.875,89.675) v1@49.923,89.627 ; U22C.4@49.923,89.225 49.948,89.2 U22C.4@50,89.2 ; v1(50.125,83.5) 50.125,82.775 C115C.2@50.05,82.7 ; v1(50.225,79.025) 50.225,82.525 C115C.2@50.05,82.7 ; v1(50.275,66.85) 50.8,66.85 C112C.2@51.1,66.55 ; C116C.2@50.39,81.5 v1(51,81.5) ; C121C.2@50.65,86.59 50.643,86.597 50.643,87.193 v1(50.65,87.2) ; U25C.5@50.875,75.675 50.875,75.35 U25C.5@50.975,75.25 ; v1(50.875,79.025) U25C.4@50.875,80.075 ; v1(50.95,82.7) C115C.2@50.05,82.7 ; v1(51.05,68.05) C113C.2@51.71,68.05 ; v1(51.5,83.175) 52.4,83.175 C117C.2@52.725,83.5 52.375,83.85 v1(51.5,83.85) ; v1(51.625,78.1) 51.628,78.102 52.248,78.102 C125C.2@52.25,78.105 ; R68C.2@52.25,75.75 R69C.2@53.15,75.75 v1(53.15,76.35) ; U21C.4@53.1,69.175 53.1,70.9 v3(53.35,71.15) 53.6,70.9 U21C.22@55.325,70.9 ; v1(53.425,84.65) R83C.2@53.425,85.25 ; C127C.2@53.475,93.91 53.48,93.905 54.095,93.905 v1(54.1,93.9) ; v1(53.75,92.3) 53.757,92.293 53.757,91.682 C118C.2@53.765,91.675 ; v1(54,83.1) C122C.2@54.66,83.1 ; U26C.4@54.8,79.325 v1(55.275,79.325) ; R66C.1@55.55,85 v1(55.55,85.6) ; C111C.2@57.365,69.775 v1(58.025,69.775) ; v1(57.55,81.8) U23C.5@57.55,82.45 ; C110C.2@58.025,68.55 C110C.2@58.05,68.575 ; C123C.2@58.49,86.25 58.507,86.267 58.507,86.868 v1(58.5,86.875) ; C124C.2@58.565,85.25 v1(59.225,85.25) ; R101.2@62.4,65.7 v1(62.4,66.3) ; R99.2@62.4,78.875 v1(62.4,79.475) ; R100.2@62.4,92.05 v1(62.4,92.65) ; v1(62.85,80.35) D6.2@62.85,80.99 ; v1(62.85,93.525) D7.2@62.85,94.165 ; v1@62.875,67.175 D8.2@62.875,67.815
  Bottom Layer w0.3: U7.9@1.72,56.08 U7.9@1.8,56 ; v1(6.05,84.975) C112A.2@6.575,84.975 ; v1(6.875,84.175) C112A.2@6.875,84.675 ; v1(12.525,88.975) 12.533,88.983 12.533,89.577 C109A.2@12.525,89.585 ; v1(13.35,85.9) C110A.2@13.35,86.7 ; U8.9@13.705,56.055 U8.9@13.71,56.05 ; v1(20.675,102.775) 20.68,102.78 21.295,102.78 C109B.2@21.3,102.785 ; U25C.5@50.975,75.25 v1(51.45,75.25) ; v1(51.1,66.05) C112C.2@51.1,66.55 ; C109C.2@57.365,71.475 v1(58.025,71.475) ; v1(58.025,67.775) C110C.2@58.025,68.55 ; C110C.2@58.05,68.575 v1(59,68.575) ; U10.9@59.21,55.95 U10.9@59.31,56.05 ; v1(59.3,57.375) v1@59.305,57.37 ; J8.5@68.454,64.675 68.952,65.173 J8.5@68.952,65.25 J8.5@68.527,65.675 ; J8.6@68.454,71.375 68.952,70.877 J8.6@68.952,70.85 J8.6@68.476,70.375 ; J6.5@68.454,77.925 68.951,78.423 J6.5@68.951,78.425 68.951,78.427 J6.5@68.454,78.925 ; J6.6@68.454,84.55 68.951,84.052 J6.6@68.951,84.025 J6.6@68.476,83.55
  Bottom Layer w0.4: v1(1.17,56.08) U7.9@1.72,56.08 ; U7.9@1.8,56 v1(1.8,57.35) ; C26.2@11.48,57.625 12.325,57.625 12.35,57.65 ; C26.2@11.5,57.625 v1(11.5,58.2) ; v1(13.07,56.055) U8.9@13.705,56.055 ; U8.9@13.718,56.058 v1@13.718,57.343 ; C126.2@21.15,59.275 21.15,58.662 21.384,58.428 22.588,58.428 22.588,59.012 v1(22.575,59.025) ; v1(46.775,56.05) 47.41,56.05 47.415,56.055 47.415,57.325 v1(47.42,57.33) ; C34.2@57.095,57.63 v1@57.095,58.185 ; v1(58.65,56.05) 59.21,56.05 U10.9@59.21,55.95 ; U10.9@59.305,56.055 v1@59.305,57.37 ; v1(69.005,58.195) 68.993,58.182 68.993,57.637 C36.2@68.98,57.625 68.996,57.625 69.056,57.565 69.056,56.994 v1(69.075,56.975)
  other v1: 57.105,58.195 48.052,58.577 1.375,59.15 13.3,59.625 11.175,59.65 68.975,59.675 61.125,59.7 66.853,59.698 46.567,60.093 58.425,61.4 1.35,62.075 22,62.35 11.175,62.375 13.29,62.36 19.878,62.373 62.375,62.725 69.025,62.775 48.775,63.9 58.45,63.9 67.8,64.5 1.375,64.9 61.25,65.075 13.272,65.277 21.975,65.275 11.15,65.3 19.86,65.29 58.45,65.977 48.8,66 56.328,66 67.8,66 62.85,67.175 1.35,67.825 61.25,68.15 11.175,68.725 13.29,68.71 19.85,68.725 21.965,68.71 67.8,70.125 61.275,70.875 1.375,71.15 13.272,71.627 21.947,71.627 11.15,71.65 19.825,71.65 67.8,71.65 69,73 1.375,73.8 4.258,73.892 62.925,74.725 48.375,75.65 4.347,76.227 69.025,76.225 1.35,76.25 62.975,77.45 67.8,77.65 17.8,78.125 54.05,78.275 31.75,78.525 34.85,78.525 27.15,78.925 19.85,78.95 23.975,78.95 67.8,79.1 46.372,79.5 44.25,79.523 27.15,79.675 19.85,79.7 23.975,79.7 13.825,79.75 31.75,80.375 34.825,80.375 20.325,80.55 21.275,80.55 22.625,80.55 31.4,81.45 46.347,82.175 44.225,82.198 18.1,82.375 28.375,82.625 14.375,83.275 67.8,83.275 28.375,83.5 46.347,84.6 44.225,84.623 67.8,84.675 18.075,85.85 34.775,86.425 31.325,86.45 69,86.475 1.4,87.1 44.925,87.15 34.775,87.175 22.125,87.475 28.85,87.6 44.925,87.875 34.775,87.925 51.05,88.45 27.575,88.55 34.775,88.675 18.05,88.925 69,89.375 27.575,89.45 34.775,89.7 60.45,90.025 28.85,90.15 44.925,90.45 34.775,90.475 67.8,90.75 1.375,91.05 44.925,91.175 34.775,91.225 23.875,91.7 34.775,92 67.8,92.325 57.625,92.85 13.65,93.3 26.075,93.575 43.75,94.05 23.85,94.1 1.375,94.831 46.325,94.9 18.075,95.475 60.475,95.85 23.825,96.1 67.8,96.375 26.075,97.15 67.8,97.9 58.3,98.325 1.375,98.613 38.9,99.7 43.15,99.725 49.05,100.8 52.831,100.8 56.613,100.8 60.563,100.825 64.512,100.85 36.7,101.65 40.975,101.925 1.375,102.394 38.9,103.8 13.675,105 10.725,105.05 28.1,106.1 1.375,106.175 38.275,109.075 13.025,110.2 1.4,110.575 26.55,111.225 25.5,111.775 10.775,111.975 14.5,111.975 45.6,112.325 8.781,114 12.562,114 16.344,114 20.125,114 24.075,114.025 28.025,114.05 31.806,114.05 35.587,114.05 39.369,114.05 43.319,114.075
  other v3: 52.6,70.4 54.1,70.4 52.6,71.9 54.1,71.9 25.075,85.25 24.125,85.825 26.025,85.825 25.075,86.4 7.775,88.525 9.275,88.525 7.775,90.025 9.275,90.025 20.225,106.05 21.725,106.05 20.225,107.55 21.725,107.55
GRSTZ: C58.1 R94.2 U12.18 | length 3.8
  Top Layer w0.15: R94.2@48.65,33.225 49.59,33.225 C58.1@49.6,33.235 49.61,33.225 v1(50.325,33.225)
  Bottom Layer w0.15: v1(50.325,33.225) 50.8,33.225 51.1,32.925 U12.18@51.1,31.75
HUB_I2C.SCL: R50.2 TP12.1 U6.H2 U12.6 U15.6 | length 49.6
  Top Layer w0.15: U15.6@37.45,18.25 R50.2@39.025,18.25 v1(39.025,18.875)
  Layer 4 w0.12: v1(26.275,37.1) 26.275,34.2 26.75,33.725 29.4,33.725 34.075,29.05 34.075,20.95 36.15,18.875 v1(39.025,18.875)
  Bottom Layer w0.076: 32.275,37.8 32.875,37.8
  Bottom Layer w0.12: v1(26.275,37.1) 26.975,37.8 29.225,37.8 32.275,37.8 ; 32.875,37.8 U6.H2@33.075,37.8
  Bottom Layer w0.15: v1(39.025,18.875) 39.75,18.875 41.25,18.875 41.75,19.375 41.75,21.95 44.6,24.8 U12.6@48.65,24.8
HUB_I2C.SDA: R49.2 TP13.1 U6.G1 U12.5 U15.5 | length 50.9
  Top Layer w0.15: v1(37.5,17.025) 37.5,17.45 37.45,17.5 R49.2@39.025,17.5
  Layer 4 w0.12: v1(25.65,34.225) 26.5,33.375 29.275,33.375 33.725,28.925 33.725,20.8 v1(37.5,17.025)
  Bottom Layer w0.12: v1(25.65,34.225) 25.65,35.775 27.425,37.55 U6.G1@32.575,37.55
  Bottom Layer w0.15: v1(37.5,17.025) 38.25,17.025 TP13.1@38.3,16.975 ; TP13.1@38.3,17.025 40.25,17.025 42.175,18.95 42.175,21.775 44.7,24.3 U12.5@48.65,24.3
MCU_TEST_POINT1: TP39.1 U6.B17 | length 11
  Layer 4 w0.12: v1(38.025,32.95) 38.025,33.4 38.325,33.7 42.375,33.7 42.775,34.1 v1(42.775,34.875)
  Bottom Layer w0.076: 36.825,35.25 36.825,35.85
  Bottom Layer w0.12: 36.825,35.25 36.825,33.575 37.45,32.95 v1@38.05,32.95 ; 36.825,35.85 U6.B17@36.825,36.05 ; v1(42.775,34.875) TP39.1@42.775,35.675
MCU_TEST_POINT2: TP40.1 U6.AD22 | length 5.3
  Bottom Layer w0.12: U6.AD22@38.075,42.05 38.075,44.25 38.275,44.45 39.45,44.45 v1(40.025,43.875) TP40.1@40.875,43.875
NetC2_1: C2.1 L1.2 U1.16 | length 4.4
  Top Layer w1: C2.1@37.575,63.925 C2.1@37.58,63.93 ; U1.16@39.58,63.93 U1.16@39.585,63.935
  Top Layer w1.2: 37.575,61.5 C2.1@37.575,63.925 ; C2.1@37.58,63.93 U1.16@39.58,63.93
NetC3_1: C3.1 C4.1 L2.1 TP1.1 U1.9 | length 5.7
  Top Layer w0.3: C4.1@36.9,81.7 C4.1@36.908,81.707
  Top Layer w0.4: C4.1@36.908,81.707 U1.9@39.578,81.707
  Bottom Layer w0.3: U1.9@39.585,81.715 U1.9@39.6,81.7
  Bottom Layer w0.4: U1.9@39.6,81.7 TP1.1@42.625,81.7
NetC14_1: C14.1 C16.1 R6.1 R7.1 U3.8 U3.9 U3.10 | length 8.6
  Top Layer w0.2: C16.1@25.575,82.975 26.075,82.975 U3.10@26.075,84.425 ; U3.10@26.075,84.43 26.095,84.45 26.5,84.45 R7.1@27.4,85.35
  Top Layer w0.25: U3.8@25.075,84.425 25.075,82.975 C16.1@25.575,82.975 U3.9@25.575,84.425 ; R7.1@27.4,85.35 R6.1@27.4,86.325 v1(28,86.325)
NetC15_1: C15.1 FB1.2 R5.1 U3.1 U3.2 | length 7.1
  Top Layer w0.2: R5.1@24.65,89.475 25.525,89.475 26.075,88.925 U3.1@26.075,87.225 ; U3.2@25.575,87.225 25.575,88.3 C15.1@26.1,88.825
  Top Layer w0.7: C15.1@26.025,88.825 FB1.2@26.025,90.775
NetC19_1: C19.1 R11.1 U3.7 | length 3.5
  Top Layer w0.2: R11.1@23.75,81.225 23.75,83.05 24.3,83.6 24.575,83.875 U3.7@24.575,84.425
NetC25_1: C25.1 U5.15 | length 1.3
  Top Layer w0.25: U5.15@27,25.275 27,24.21 C25.1@27.135,24.075
NetC28_1: C28.1 U6.D2 Y1.2 | length 5.9
  Bottom Layer w0.12: Y1.2@29.55,35.825 29.55,36.625 29.825,36.9 32.933,36.9 33.033,36.8 U6.D2@33.075,36.8
  Bottom Layer w0.2: C28.1@29.575,34.425 Y1.2@29.575,35.8
NetC29_1: C29.1 U6.F2 Y1.1 | length 7.1
  Bottom Layer w0.12: Y1.1@28.15,35.825 28.15,36.7 28.6,37.15 32.902,37.15 33.052,37.3 U6.F2@33.075,37.3
  Bottom Layer w0.2: C29.1@27.05,35.825 28.05,35.825 Y1.1@28.15,35.825
NetC54_1: C54.1 R33.1 U12.29 Y3.1 | length 5.7
  Top Layer w0.2: Y3.1@54.65,35.95 54.9,35.7 54.9,34.56 C54.1@54.91,34.55 54.9,34.54 54.9,34 55.3,33.6 R33.1@56.4,33.6 56.325,33.525 v1(56.325,32.975)
  Bottom Layer w0.2: v1(56.325,32.975) 56.6,32.7 U12.29@56.6,31.75
NetC55_1: C55.1 R33.2 U12.30 Y3.3 | length 10.1
  Top Layer w0.2: v1(57.375,32.975) 57.375,33.525 R33.2@57.3,33.6 58.35,33.6 58.79,34.04 C55.1@58.79,34.55 60.05,34.55 60.425,34.925 60.425,37.275 59.35,38.35 Y3.3@59.05,38.35
  Bottom Layer w0.2: U12.30@57.1,31.75 57.1,32.7 v1(57.375,32.975)
NetC106_1: C106.1 D3.K FB4.2 J3.1 | length 13.2
  Top Layer w0.5: C106.1@57.75,3.615 FB4.2@57.75,4.9 ; 60.025,3.7 60.025,4.625 D3.K@60.3,4.9 ; D3.K@60.281,4.919 60.494,4.919 61,5.425 v1(61,6.475) ; v1(60.4,6.475) v1(61,6.475) ; v1(61.604,6.475) v1(61,6.475)
  Top Layer w0.8: FB4.2@57.75,4.9 57.769,4.919 D3.K@60.281,4.919
  Bottom Layer w0.6: v1(60.4,6.475) v1(61,6.475) v1(61.604,6.475) 63.775,6.475 J3.1@63.775,4.924
NetC107_1: C107.1 D4.K FB5.2 J4.1 | length 12.6
  Top Layer w0.4: C107.1@40.712,3.603 FB5.2@40.712,4.862
  Top Layer w0.5: 42.8,3.7 D4.K@42.8,4.625 ; D4.K@43.075,4.925 43.25,4.925 43.775,5.45 v1(43.775,6.452) ; v1(43.175,6.452) v1(43.775,6.452) ; v1(44.379,6.452) v1(43.775,6.452)
  Top Layer w0.8: FB5.2@40.725,4.875 40.75,4.9 D4.K@43.05,4.9
  Bottom Layer w0.6: v1(43.175,6.452) v1(43.775,6.452) v1(44.379,6.452) 46.55,6.452 J4.1@46.55,4.9
NetC108_1: C108.1 D5.K FB6.2 J5.1 | length 12.6
  Top Layer w0.4: C108.1@23.5,3.59 FB6.2@23.5,4.875
  Top Layer w0.5: 25.575,3.7 D5.K@25.575,4.625 ; D5.K@25.85,4.925 26.025,4.925 26.55,5.45 v1(26.55,6.476) ; v1(25.95,6.476) v1(26.55,6.476) ; v1(27.154,6.476) v1(26.55,6.476)
  Top Layer w0.8: FB6.2@23.5,4.875 D5.K@25.85,4.875
  Bottom Layer w0.6: v1(25.95,6.476) v1(26.55,6.476) v1(27.154,6.476) 29.325,6.476 J5.1@29.325,4.925
NetC114A_1: C114A.1 R77A.2 R78A.1 | length 4
  Bottom Layer w0.15: R78A.1@9.475,99.375 R77A.2@10.375,99.375 10.9,99.375 11.7,98.575 C114A.1@11.7,97.1
NetC114A_2: C114A.2 R79A.1 TP35A.1 U26A.1 U26A.2 | length 18.2
  Layer 4 w0.15: v1(7.975,97.45) 9.725,99.2 14.675,99.2 v1(15.15,98.725)
  Bottom Layer w0.15: v1(7.975,97.45) U26A.1@8.475,97.45 U26A.2@8.975,97.45 ; TP35A.1@11.825,93.15 C114A.2@11.825,94.225 ; C114A.2@11.825,94.35 C114A.2@11.825,94.225 ; v1(15.15,98.725) R79A.1@14.55,98.725 14.55,94.446 14.104,94 12.05,94 C114A.2@11.825,94.225
NetC114B_1: C114B.1 R77B.2 R78B.1 | length 4.1
  Bottom Layer w0.15: C114B.1@28.8,103.5 30.15,103.5 31.075,104.425 R77B.2@31.075,104.95 R78B.1@31.075,105.85
NetC114B_2: C114B.2 R79B.1 TP35B.1 U26B.1 U26B.2 | length 16.9
  Layer 4 w0.15: v1(29.15,107.35) 30.9,105.6 30.9,100.65 v1(30.425,100.175)
  Bottom Layer w0.15: TP35B.1@24.85,103.5 C114B.2@26.05,103.5 26.375,103.175 26.375,102.3 27.9,100.775 R79B.1@30.425,100.775 v1(30.425,100.175) ; U26B.2@29.15,106.35 U26B.1@29.15,106.85 v1(29.15,107.35)
NetC114C_1: C114C.1 R77C.2 R78C.1 | length 4
  Bottom Layer w0.15: R78C.1@54.3,81.25 R77C.2@55.2,81.25 55.725,81.25 56.525,80.45 C114C.1@56.525,78.975
NetC114C_2: C114C.2 R79C.1 TP35C.1 U26C.1 U26C.2 | length 18.3
  Layer 4 w0.15: v1(52.8,79.325) 54.55,81.075 59.5,81.075 v1(59.975,80.6)
  Bottom Layer w0.15: v1(52.8,79.325) U26C.1@53.3,79.325 U26C.2@53.8,79.325 ; TP35C.1@56.525,75.025 56.525,76.225 56.9,75.85 58.85,75.85 59.375,76.375 59.375,80.6 v1(59.975,80.6)
NetC117A_1: C117A.1 R78A.2 U26A.3 | length 2.8
  Bottom Layer w0.15: C117A.1@7.9,98.875 8.3,98.475 R78A.2@9.475,98.475 U26A.3@9.475,97.45
NetC117B_1: C117B.1 R78B.2 U26B.3 | length 2.8
  Bottom Layer w0.15: U26B.3@29.15,105.85 R78B.2@30.175,105.85 30.175,107.025 C117B.1@30.575,107.425
NetC117C_1: C117C.1 R78C.2 U26C.3 | length 2.8
  Bottom Layer w0.15: C117C.1@52.725,80.75 53.125,80.35 R78C.2@54.3,80.35 U26C.3@54.3,79.325
NetJ2_A5: J2.A5 R59.1 | length 3.1
  Top Layer w0.2: R59.1@4.25,8.1 v1(6.425,8.1)
  Bottom Layer w0.2: v1(6.425,8.1) J2.A5@7.355,8.1
NetJ2_B5: J2.B5 R58.1 | length 3.1
  Top Layer w0.2: R58.1@4.25,11.1 v1(6.425,11.1)
  Bottom Layer w0.2: v1(6.425,11.1) J2.B5@7.355,11.1
NetJ6_4: J6.4 R99.1 | length 2.3
  Bottom Layer w0.2: R99.1@63.3,78.9 64.475,78.9 64.775,79.2 64.775,79.495 65.005,79.725 J6.4@65.076,79.725
NetJ7_4: J7.4 R100.1 | length 3.8
  Bottom Layer w0.2: R100.1@63.3,92.05 64.4,92.05 64.7,92.35 64.7,92.67 64.93,92.9 J7.4@65.076,92.9
  Bottom Layer w0.3: J7.4@65.076,92.9 65.089,92.888 66.543,92.888 v1(66.555,92.875)
NetJ8_4: J8.4 R101.1 | length 2.3
  Bottom Layer w0.2: R101.1@63.3,65.7 64.45,65.7 64.775,66.025 64.775,66.32 65.005,66.55 J8.4@65.076,66.55
NetLD1_K: LD1.K R3.1 | length 1.3
  Bottom Layer w0.2: LD1.K@22.15,20.402 R3.1@22.15,21.702
NetLD2_K: LD2.K R16.1 | length 1.3
  Bottom Layer w0.12: R16.1@64.475,39.85 LD2.K@65.775,39.85
NetLD3_K: LD3.K R17.1 | length 1.3
  Bottom Layer w0.12: R17.1@67.075,39.85 LD3.K@68.375,39.85
NetLD4_K: LD4.K R22.1 | length 1.3
  Bottom Layer w0.12: R22.1@67.075,34.25 LD4.K@68.375,34.25
NetLD5_K: LD5.K R23.1 | length 1.3
  Bottom Layer w0.12: R23.1@64.475,34.25 LD5.K@65.775,34.25
NetQ1_D1: Q1.3 Q1.6 R2.2 | length 5.2
  Top Layer w0.2: Q1.6@33.775,49.7 34.8,49.7 35.4,50.3 35.4,51.3 35.7,51.6 Q1.3@36.425,51.6
  Top Layer w0.3: Q1.3@36.425,51.6 36.437,51.587 37.613,51.587 R2.2@37.625,51.575
NetQ1_D2: Q1.4 R1.2 | length 1.7
  Top Layer w0.3: R1.2@32.1,51.6 Q1.4@33.775,51.6
  Top Layer w0.6: R1.2@32.075,51.575 R1.2@32.1,51.6
NetQ2A_G: Q2A.1 R18A.2 R19A.1 | length 4.3
  Top Layer w0.12: Q2A.1@12.4,98.475 12.525,98.475 14.55,96.45 R19A.1@14.55,96.025 R18A.2@14.55,95.125
NetQ2B_G: Q2B.1 R18B.2 R19B.1 | length 4.2
  Top Layer w0.12: R18B.2@26.838,100.775 27.738,100.775 28.163,100.775 Q2B.1@30.188,102.8
NetQ2C_G: Q2C.1 R18C.2 R19C.1 | length 4.2
  Top Layer w0.12: Q2C.1@57.35,80.363 59.375,78.338 59.375,77.913 R18C.2@59.375,77.013
NetR1_1: R1.1 TP3.1 U1.2 | length 20.3
  Top Layer w0.2: v1(31.025,49.725) R1.1@32.075,49.725
  Layer 4 w0.2: U1.2@29.425,66.475 31.7,64.2 31.7,62.325 32.2,61.825 32.2,50.9 v1(31.025,49.725)
  Bottom Layer w0.2: TP3.1@30.125,49.725 v1(31.025,49.725)
NetR5_2: R5.2 R9.1 U3.3 | length 2.4
  Top Layer w0.23: R5.2@24.65,88.575 25.075,88.15 U3.3@25.075,87.225
  Top Layer w0.25: R9.1@23.75,88.575 R5.2@24.65,88.575
NetR6_2: R6.2 U3.4 | length 4.9
  Top Layer w0.23: U3.4@24.575,87.225 v1(24.575,87.875)
  Top Layer w0.25: R6.2@27.4,87.225 v1(28,87.225)
  Layer 4 w0.2: v1(24.575,87.875) 27.35,87.875 v1(28,87.225)
NetR7_2: R7.2 R10.1 U3.5 | length 8.4
  Top Layer w0.23: v1(23.625,87.25) 23.637,87.238 24.07,87.238 24.075,87.233 U3.5@24.075,87.225
  Top Layer w0.25: R7.2@27.4,84.45 R10.1@28.3,84.45 v1(28.9,84.45)
  Layer 4 w0.2: v1(23.625,87.25) 26.1,87.25 v1(28.9,84.45)
NetR12_2: R12.2 R13.1 U5.16 | length 2.5
  Top Layer w0.2: R13.1@29.225,26.3 R12.2@29.225,27.6
  Top Layer w0.25: U5.16@28.025,26.3 R13.1@29.225,26.3
NetR14_2: R14.2 TP9.1 U5.9 | length 2.7
  Top Layer w0.15: v1(21.575,26.9) 22.15,26.9 R14.2@22.175,26.875
  Top Layer w0.25: R14.2@22.175,26.875 22.25,26.95 U5.9@23.375,26.95
  Bottom Layer w0.15: v1(21.575,26.9) TP9.1@22.45,26.9
NetR20A_1: R20A.1 U24A.5 | length 1.7
  Bottom Layer w0.15: R20A.1@4.65,112.025 4.65,111.525 5,111.175 5.6,111.175 5.625,111.15 U24A.5@5.625,111.05
NetR20B_1: R20B.1 U24B.5 | length 1.8
  Bottom Layer w0.15: U24B.5@42.75,109.675 42.85,109.675 42.875,109.7 42.875,110.325 43.225,110.675 R20B.1@43.725,110.675
NetR20C_1: R20C.1 U24C.5 | length 1.7
  Bottom Layer w0.15: R20C.1@49.475,93.9 49.475,93.4 49.8,93.075 50.425,93.075 50.45,93.05 U24C.5@50.45,92.925
NetR21A_1: R21A.1 U24A.7 | length 1
  Bottom Layer w0.15: U24A.7@6.425,111.05 R21A.1@6.425,112.025
NetR21B_1: R21B.1 U24B.7 | length 1
  Bottom Layer w0.15: U24B.7@42.75,108.875 R21B.1@43.725,108.875
NetR21C_1: R21C.1 U24C.7 | length 1
  Bottom Layer w0.15: U24C.7@51.25,92.925 R21C.1@51.25,93.9
NetR24A_1: R24A.1 U24A.6 | length 1.2
  Bottom Layer w0.15: R24A.1@5.55,112.025 5.55,112 5.725,111.825 5.75,111.825 6.025,111.55 U24A.6@6.025,111.05
NetR24B_1: R24B.1 U24B.6 | length 1.2
  Bottom Layer w0.15: U24B.6@42.75,109.275 43.225,109.275 R24B.1@43.725,109.775
NetR24C_1: R24C.1 U24C.6 | length 1.2
  Bottom Layer w0.15: R24C.1@50.375,93.9 50.375,93.875 50.55,93.7 50.575,93.7 50.85,93.425 U24C.6@50.85,92.925
NetR35_1: R35.1 U11.5 | length 1.2
  Top Layer w0.2: R35.1@57.7,14.05 U11.5@58.95,14.05
NetR36_2: R36.2 U12.32 | length 1.7
  Top Layer w0.25: v1(58.975,31.55) R36.2@59.575,31.55
  Bottom Layer w0.15: U12.32@58.125,31.55 v1(58.975,31.55)
  Bottom Layer w0.25: U12.32@58.1,31.75 58.1,31.575 U12.32@58.125,31.55
NetR37_1: R37.1 R38.1 U12.16 | length 3.2
  Top Layer w0.15: R37.1@46.875,30.475 v1(47.5,30.475)
  Top Layer w0.2: R37.1@46.875,30.475 R38.1@46.875,31.375
  Bottom Layer w0.15: v1(47.5,30.475) 48.35,30.475 48.65,30.175 U12.16@48.65,29.8
NetR41_1: R41.1 U13.5 | length 1.2
  Top Layer w0.2: R41.1@40.693,14.068 U13.5@41.942,14.068
NetR43_1: R43.1 U14.5 | length 1.2
  Top Layer w0.2: R43.1@23.467,14.092 U14.5@24.717,14.092
NetR51_2: R51.2 R55.1 U15.7 | length 2.6
  Top Layer w0.15: U15.7@37.625,18.9 37.734,19.009 38.459,19.009 R51.2@39.025,19.575 R55.1@39.025,20.475
NetR52_1: R52.1 U15.3 | length 1.5
  Top Layer w0.15: R52.1@30.325,17.9 30.675,18.25 U15.3@31.725,18.25
NetR53_1: R53.1 U15.2 | length 1.4
  Top Layer w0.15: R53.1@30.325,18.9 U15.2@31.725,18.9
NetR54_1: R54.1 U15.1 | length 1.5
  Top Layer w0.15: R54.1@30.325,19.9 30.675,19.55 U15.1@31.725,19.55
NetR56_2: R56.2 U16.4 | length 1.3
  Bottom Layer w0.2: R56.2@11.425,10.7 12.145,10.7 12.395,10.95 U16.4@12.58,10.95
NetR57_1: R57.1 U16.2 | length 1.3
  Bottom Layer w0.2: U16.2@14.62,11.6 R57.1@15.875,11.6
NetR61A_2: R61A.2 U21A.20 | length 1.4
  Bottom Layer w0.15: U21A.20@10.5,90.025 10.525,90.05 11.15,90.05 R61A.2@11.65,90.55
NetR61B_2: R61B.2 U21B.20 | length 1.4
  Bottom Layer w0.15: U21B.20@21.725,104.825 21.75,104.8 21.75,104.175 R61B.2@22.25,103.675
NetR61C_2: R61C.2 U21C.20 | length 1.4
  Bottom Layer w0.15: U21C.20@55.325,71.9 55.35,71.925 55.975,71.925 R61C.2@56.475,72.425
NetR63A_2: R63A.2 U21A.16 | length 2.8
  Bottom Layer w0.15: U21A.16@8.775,91.25 8.775,92.125 9,92.35 9.925,92.35 10.125,92.55 R63A.2@10.125,92.975
NetR63B_2: R63B.2 U21B.16 | length 2.6
  Bottom Layer w0.15: U21B.16@22.95,106.55 23.825,106.55 24.1,106.275 24.1,105.775 R63B.2@24.675,105.2
NetR63C_2: R63C.2 U21C.16 | length 2.8
  Bottom Layer w0.15: U21C.16@53.6,73.125 53.6,74 53.825,74.225 54.75,74.225 54.95,74.425 R63C.2@54.95,74.85
NetR64A_2: R64A.2 R69A.1 U21A.15 | length 2.6
  Bottom Layer w0.15: U21A.15@8.275,91.25 8.275,92.925 R69A.1@8.325,92.975 R64A.2@9.225,92.975
NetR64B_2: R64B.2 R69B.1 U21B.15 | length 2.6
  Bottom Layer w0.15: U21B.15@22.95,107.05 24.625,107.05 R69B.1@24.675,107 R64B.2@24.675,106.1
NetR64C_2: R64C.2 R69C.1 U21C.15 | length 2.6
  Bottom Layer w0.15: U21C.15@53.1,73.125 53.1,74.8 R69C.1@53.15,74.85 R64C.2@54.05,74.85
NetR65A_1: R65A.1 R71A.2 R74A.2 R76A.1 U22A.3 | length 6.9
  Layer 4 w0.15: v1@3.55,105.35 3.55,106.325 v1(4.325,107.1)
  Bottom Layer w0.15: v1(3.55,105.425) 4.075,105.425 R65A.1@4.113,105.387 ; R65A.1@4.113,105.313 4.025,105.225 4.025,104.4 3.9,104.275 4.8,104.275 5.325,103.75 R76A.1@5.8,103.75 ; v1(4.325,107.1) 4.6,106.825 U22A.3@5.175,106.825
NetR65B_1: R65B.1 R71B.2 R74B.2 R76B.1 U22B.3 | length 6.9
  Layer 4 w0.15: v1(37.125,111.775) 38.025,111.775 v1(38.8,111)
  Bottom Layer w0.15: R76B.1@35.45,109.525 35.45,110 R74B.2@35.975,110.525 R71B.2@35.975,111.425 36.1,111.3 36.925,111.3 R65B.1@37.05,111.175 ; R65B.1@37.125,111.175 v1(37.125,111.775) ; U22B.3@38.525,110.125 38.525,110.725 v1(38.8,111)
NetR65C_1: R65C.1 R71C.2 R74C.2 R76C.1 U22C.3 | length 6.9
  Layer 4 w0.15: v1@48.375,87.225 48.375,88.2 v1(49.15,88.975)
  Bottom Layer w0.15: v1(48.375,87.3) 48.9,87.3 R65C.1@48.938,87.262 ; R65C.1@48.938,87.188 48.85,87.1 48.85,86.275 48.725,86.15 49.625,86.15 50.15,85.625 R76C.1@50.625,85.625 ; v1(49.15,88.975) 49.425,88.7 U22C.3@50,88.7
NetR66A_2: R66A.2 R67A.1 U23A.6 | length 5.5
  Layer 4 w0.15: v1(9.225,102.225) 11.175,100.275 v1(11.925,100.275)
  Bottom Layer w0.15: v1(9.225,102.225) R67A.1@9.825,102.225 R66A.2@9.825,103.125 ; v1(11.925,100.275) U23A.6@11.925,100.725
NetR66B_2: R66B.2 R67B.1 U23B.6 | length 5.5
  Layer 4 w0.15: v1(31.975,103.4) 31.975,104.15 v1(33.925,106.1)
  Bottom Layer w0.15: v1(31.975,103.4) U23B.6@32.425,103.4 ; v1(33.925,106.1) R67B.1@33.925,105.5 R66B.2@34.825,105.5